# Altium PCB PCB_Flex_LED_v2.0.PcbDoc
Units mil, origin at the board's own origin, x right, y up, seen from the top; angles counter-clockwise.
Board outline 174.54 x 2164.04 mil, 2 copper layers (Top Layer, Bottom Layer), stack 3.756 mil thick; 4 components, 4 nets, 16 pads, 8 vias.
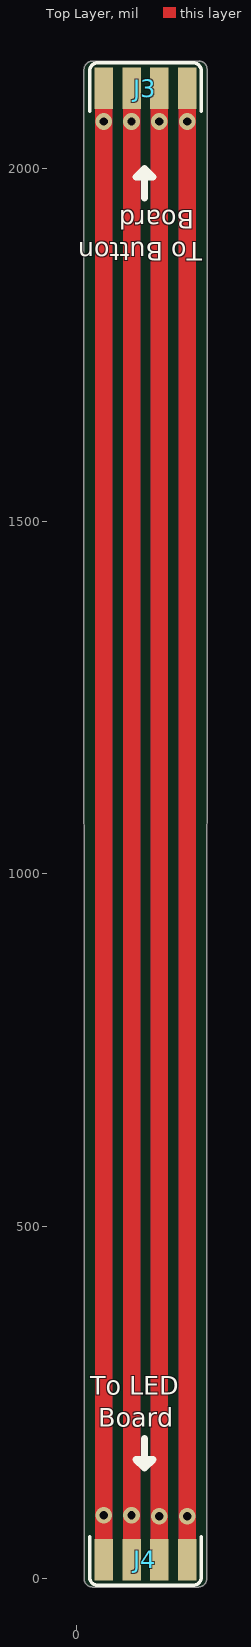
[diagram p0: Top Layer view]
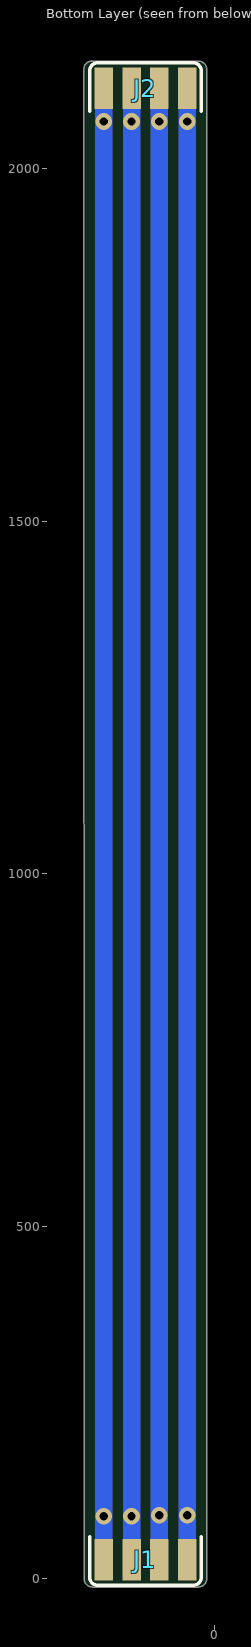
[diagram p1: Bottom Layer view, seen from below]

## Layer stack, top to bottom
Top Solder: solder mask 0.5, Solder Resist, Dk 3.5
Top Layer: signal copper 1.378
Dielectric 1: core 1, Polyimide, Dk 3.5
Bottom Layer: signal copper 1.378
Bottom Solder: solder mask 0.5, Solder Resist, Dk 3.5

## Board outline
11,0 ccw(c22.53,-0.03) 22.32,-11.55 173.44,-11.55 ccw(c173.24,-0.03) 184.77,0 185.15,2141.21 ccw(c173.91,2141.24) 174.11,2152.48 174.11,2152.4 22.99,2152.4 ccw(c23.22,2139.8) 10.61,2139.77

## Design rules (kind name [scope] priority, off if disabled: settings)
Clearance [All] p1: gap=10 ignorepadtopadclearanceinfootprint=FALSE except(0: Arc-Hole Track-Hole SMDPad-Hole THPad-Hole Via-Hole Fill-Hole Poly-Hole Region-Hole Text-Hole)
HoleToHoleClearance [All] p1: gap=0 allowstackedmicrovias=TRUE
MinimumSolderMaskSliver [All] p1: minsoldermaskwidth=0
PolygonConnect [All] p1: connectstyle=Relief reliefconductorwidth=10 reliefentries=4 polygonreliefangle="90 Angle" airgapwidth=10
RoutingVias [All] p1: holewidth=11.81 width=23.62 viastyle="Through Hole" minholewidth=11.81 minwidth=23.62 maxholewidth=11.81 maxwidth=23.62
SilkToSilkClearance [All] p1: silktosilkclearance=0
SilkToSolderMaskClearance [IsPad] p1: minsilkscreentomaskgap=0 clearancetoexposedcopper=TRUE
SolderMaskExpansion [All] p1: expansion=4 istentingtop=FALSE
Width [All] p1: maxlimit=25 minlimit=10 preferedwidth=10 minimp=50.000000 maximp=50.000000 favimp=50.000000
26 further rules are at their usual default settings.

## Classes and differential pairs
component class Flex-LED: J1 J2

## Components (designator, comment, footprint, x,y, rotation, side; value= is the part's Value field where it differs from the comment)
J1 "1mm FPC" "FPC-1MM-4P - NEW" 97.87,22 r0 bottom
J2 "1mm FPC" "FPC-1MM-4P - NEW" 97.87,2118.72 r180 bottom
J3 "1mm FPC" "FPC-1MM-4P - NEW" 97.87,2118.72 r0 top (schematic designator J2)
J4 "1mm FPC" "FPC-1MM-4P - NEW" 97.87,22 r180 top (schematic designator J1)

## Footprints (in the part's own frame and the unit in brackets; to place one, negate y for a bottom-side part, rotate by r counter-clockwise, add the part's x,y. Pads: shape width x height; smd on the part's side, far side on the other; paste and mask are expansions set on the pad)
"FPC-1MM-4P - NEW" [mm]
  rect 0.67x1.5 smd paste+0: 1(1.5,-0.127) 2(0.5,-0.127) 3(-0.5,-0.127) 4(-1.5,-0.127)
  silkscreen extent -2.01,-0.95 2.01,0.8

## Part data
J1 J2 J3 J4: library part FPC-1mm-4P-New, "1mm Pitch 4P FPC"

## Via types
v1: diameter 23.62, hole 11.81, Top Layer to Bottom Layer, 8 vias

## Nets (pads, with @x,y where several pads share a name; then routed paths per layer and width w, separated by ;. In a path a pad name is that pad's centre, name@x,y a point inside that pad or via, vN(x,y) a via of type N, cw(c..) or ccw(c..) an arc to the next point about the centre after c; other vN are vias at no path point)
NetJ1_1: J1.1 J2.4 J3.1 J4.4 | length 4173.4
  Top Layer w25: J4.4 J3.1
  Bottom Layer w25: J1.1 v1(156.93,2066.72) J2.4
  other v1: 156.93,89
NetJ1_2: J1.2 J2.3 J3.2 J4.3 | length 4172.4
  Top Layer w25: J4.3 v1(117.56,89) v1(117.56,2066.72) J3.2
  Bottom Layer w25: J1.2 J2.3@117.56,2112.65
NetJ1_3: J1.3 J2.2 J3.3 J4.2 | length 4169.4
  Top Layer w25: J4.2 v1(78.19,90) v1(78.19,2066.72) J3.3
  Bottom Layer w25: J1.3@78.19,29 J2.2@78.19,2111.72
NetJ1_4: J1.4 J2.1 J3.4 J4.1 | length 4173.4
  Top Layer w25: J4.1 v1(38.82,2066.72) J3.4
  Bottom Layer w25: J1.4 v1(38.82,2066.72) J2.1
  other v1: 38.82,90

## Polygon pours and split planes (outlines as drawn)
no net on Fabrication info "NONET_L-01_P-001" (solid): 185.15,2048.86 185.15,2140.01 ccw(c172.76,2140.01) 172.76,2152.39 21.79,2152.39 ccw(c21.79,2141.2) 10.6,2141.2 10.6,2048.86
no net on Fabrication info "NONET_L-01_P-001" (solid): 185.15,91.86 185.15,0.7 cw(c172.76,0.7) 172.76,-11.68 21.79,-11.68 cw(c21.79,-0.49) 10.6,-0.49 10.6,91.86

## Silkscreen, mask and mechanical layers (free items; w line width, h text height)
Top Overlay:
  lines w10: 96.47,198.72 96.47,157 ; 96.47,1958 96.47,1999.72 ; 96.47,157 108.47,169 84.47,169 96.47,157 ; 96.47,1999.72 84.47,1987.72 108.47,1987.72 96.47,1999.72
  text "To Button /  Board" at 178.75,1949.85 h45 r180
  text "To LED /  Board" at 19.25,206.81 h45
Board Outline:
  lines w5: 171.89,2152.4 cw(c171.89,2149.26) 174.11,2151.48
  lines w10: 174.11,2152.4 22.99,2152.4 ccw(c23.22,2139.8) 10.61,2139.77 11,0 ccw(c22.53,-0.03) 22.32,-11.55 173.44,-11.55 ccw(c173.24,-0.03) 184.77,0 185.15,2141.21 ccw(c173.91,2141.24) 174.11,2152.48
Fabrication info:
  drawing of 195 lines, arcs and shapes, not listed
  text "Layer" at 3952.34,2321.99 h60
  text "Name" at 4362.26,2321.99 h60
  text "Material" at 5292,2321.99 h60
  text "Thickness" at 6151.77,2321.99 h60
  text "Constant" at 6801.6,2321.99 h60
  text "Board Layer Stack" at 7371.46,2321.99 h60
  text "Top Overlay" at 4362.26,2201.99 h60
  text "Top Solder" at 4362.26,2081.99 h60
  text "Solder Resist" at 5292,2081.99 h60
  text "0.50mil" at 6151.77,2081.99 h60
  text "3.5" at 6801.6,2081.99 h60
  text "Stiffener Area: 2.6mm" at 465,2076 h60
  text "1" at 3952.34,1961.99 h60
  text "Top Layer" at 4362.26,1961.99 h60
  text "1.38mil" at 6151.77,1961.99 h60
  text "Dielectric 1" at 4362.26,1841.99 h60
  text "Polyimide" at 5292,1841.99 h60
  text "1.00mil" at 6151.77,1841.99 h60
  text "3.5" at 6801.6,1841.99 h60
  text "2" at 3952.34,1721.99 h60
  text "Bottom Layer" at 4362.26,1721.99 h60
  text "1.38mil" at 6151.77,1721.99 h60
  text "Bottom Solder" at 4362.26,1601.99 h60
  text "Solder Resist" at 5292,1601.99 h60
  text "0.50mil" at 6151.77,1601.99 h60
  text "3.5" at 6801.6,1601.99 h60
  text "Bottom Overlay" at 4362.26,1481.99 h60
  text "Note:" at 374.78,1466.04 h60
  text "Total board thickness:" at 3952.34,1361.99 h60
  text "4.76mil" at 6151.77,1361.99 h60
  text "Stiffener Material: Polyimide" at 368.78,1351.03 h60
  text "Stiffener Thickness: 0.225 mm" at 370.05,1255.05 h60
  text "Stiffener side: Bottom side of PCB" at 369.1,1169.05 h60
  text "Total Thickness of PCB (0.3mm): Stiffener thickness + Layer Stackup thickness." at 360.72,736.01 h60
  text "Stiffener Area: 2.6mm" at 470.78,14.04 h60
Drill Drawing:
  lines w10: 223.29,2785.5 289.96,2785.5 289.96,2852.17 223.29,2852.17 223.29,2785.5
  lines w15: 163.5,2740.5 8391.25,2740.5 ; 163.5,2890.5 8391.25,2890.5 ; 714.38,2590.5 714.38,3040.5 ; 1194.26,2590.5 1194.26,3040.5 ; 2263.95,2590.5 2263.95,3040.5 ; 2769.82,2590.5 2769.82,3040.5 ; 3503.62,2590.5 3503.62,3040.5 ; 5003.17,2590.5 5003.17,3040.5 ; 5593.02,2590.5 5593.02,3040.5 ; 6338.82,2590.5 6338.82,3040.5 ; 6988.65,2590.5 6988.65,3040.5 ; 163.5,2590.5 8391.25,2590.5 8391.25,3040.5 163.5,3040.5 163.5,2590.5
  text "Symbol" at 253.5,2935.5 h72
  text "Count" at 759.38,2935.5 h72
  text "Hole Size" at 1239.26,2935.5 h72
  text "Plated" at 2308.95,2935.5 h72
  text "Hole Type" at 2814.82,2935.5 h72
  text "Drill Layer Pair" at 3548.62,2935.5 h72
  text "Via/Pad" at 5048.17,2935.5 h72
  text "Pad Shape" at 5638.02,2935.5 h72
  text "Template" at 6383.82,2935.5 h72
  text "Routed Path Length" at 7033.65,2935.5 h72
  text "8" at 759.38,2785.5 h60
  text "11.81mil (0.300mm)" at 1239.26,2785.5 h60
  text "PTH" at 2308.95,2785.5 h60
  text "Round" at 2814.82,2785.5 h60
  text "Top Layer - Bottom Layer" at 3548.62,2785.5 h60
  text "Via" at 5048.17,2785.5 h60
  text "Rounded" at 5638.02,2785.5 h60
  text "v60h30" at 6383.82,2785.5 h60
  text "-" at 7033.65,2785.5 h60
  text "8 Total" at 759.38,2635.5 h60